# Altium PCB 24V-10A-Power-Board-v1.0.PcbDoc (part 4 of 5)
Units mil, origin at the board's own origin, x right, y up, seen from the top; angles counter-clockwise.
Board outline 6000 x 4000 mil, 2 copper layers (Top Layer, Bottom Layer); 609 components, 307 nets, 1491 pads, 0 vias.
Unrouted connection lines stored in the file: 1132.
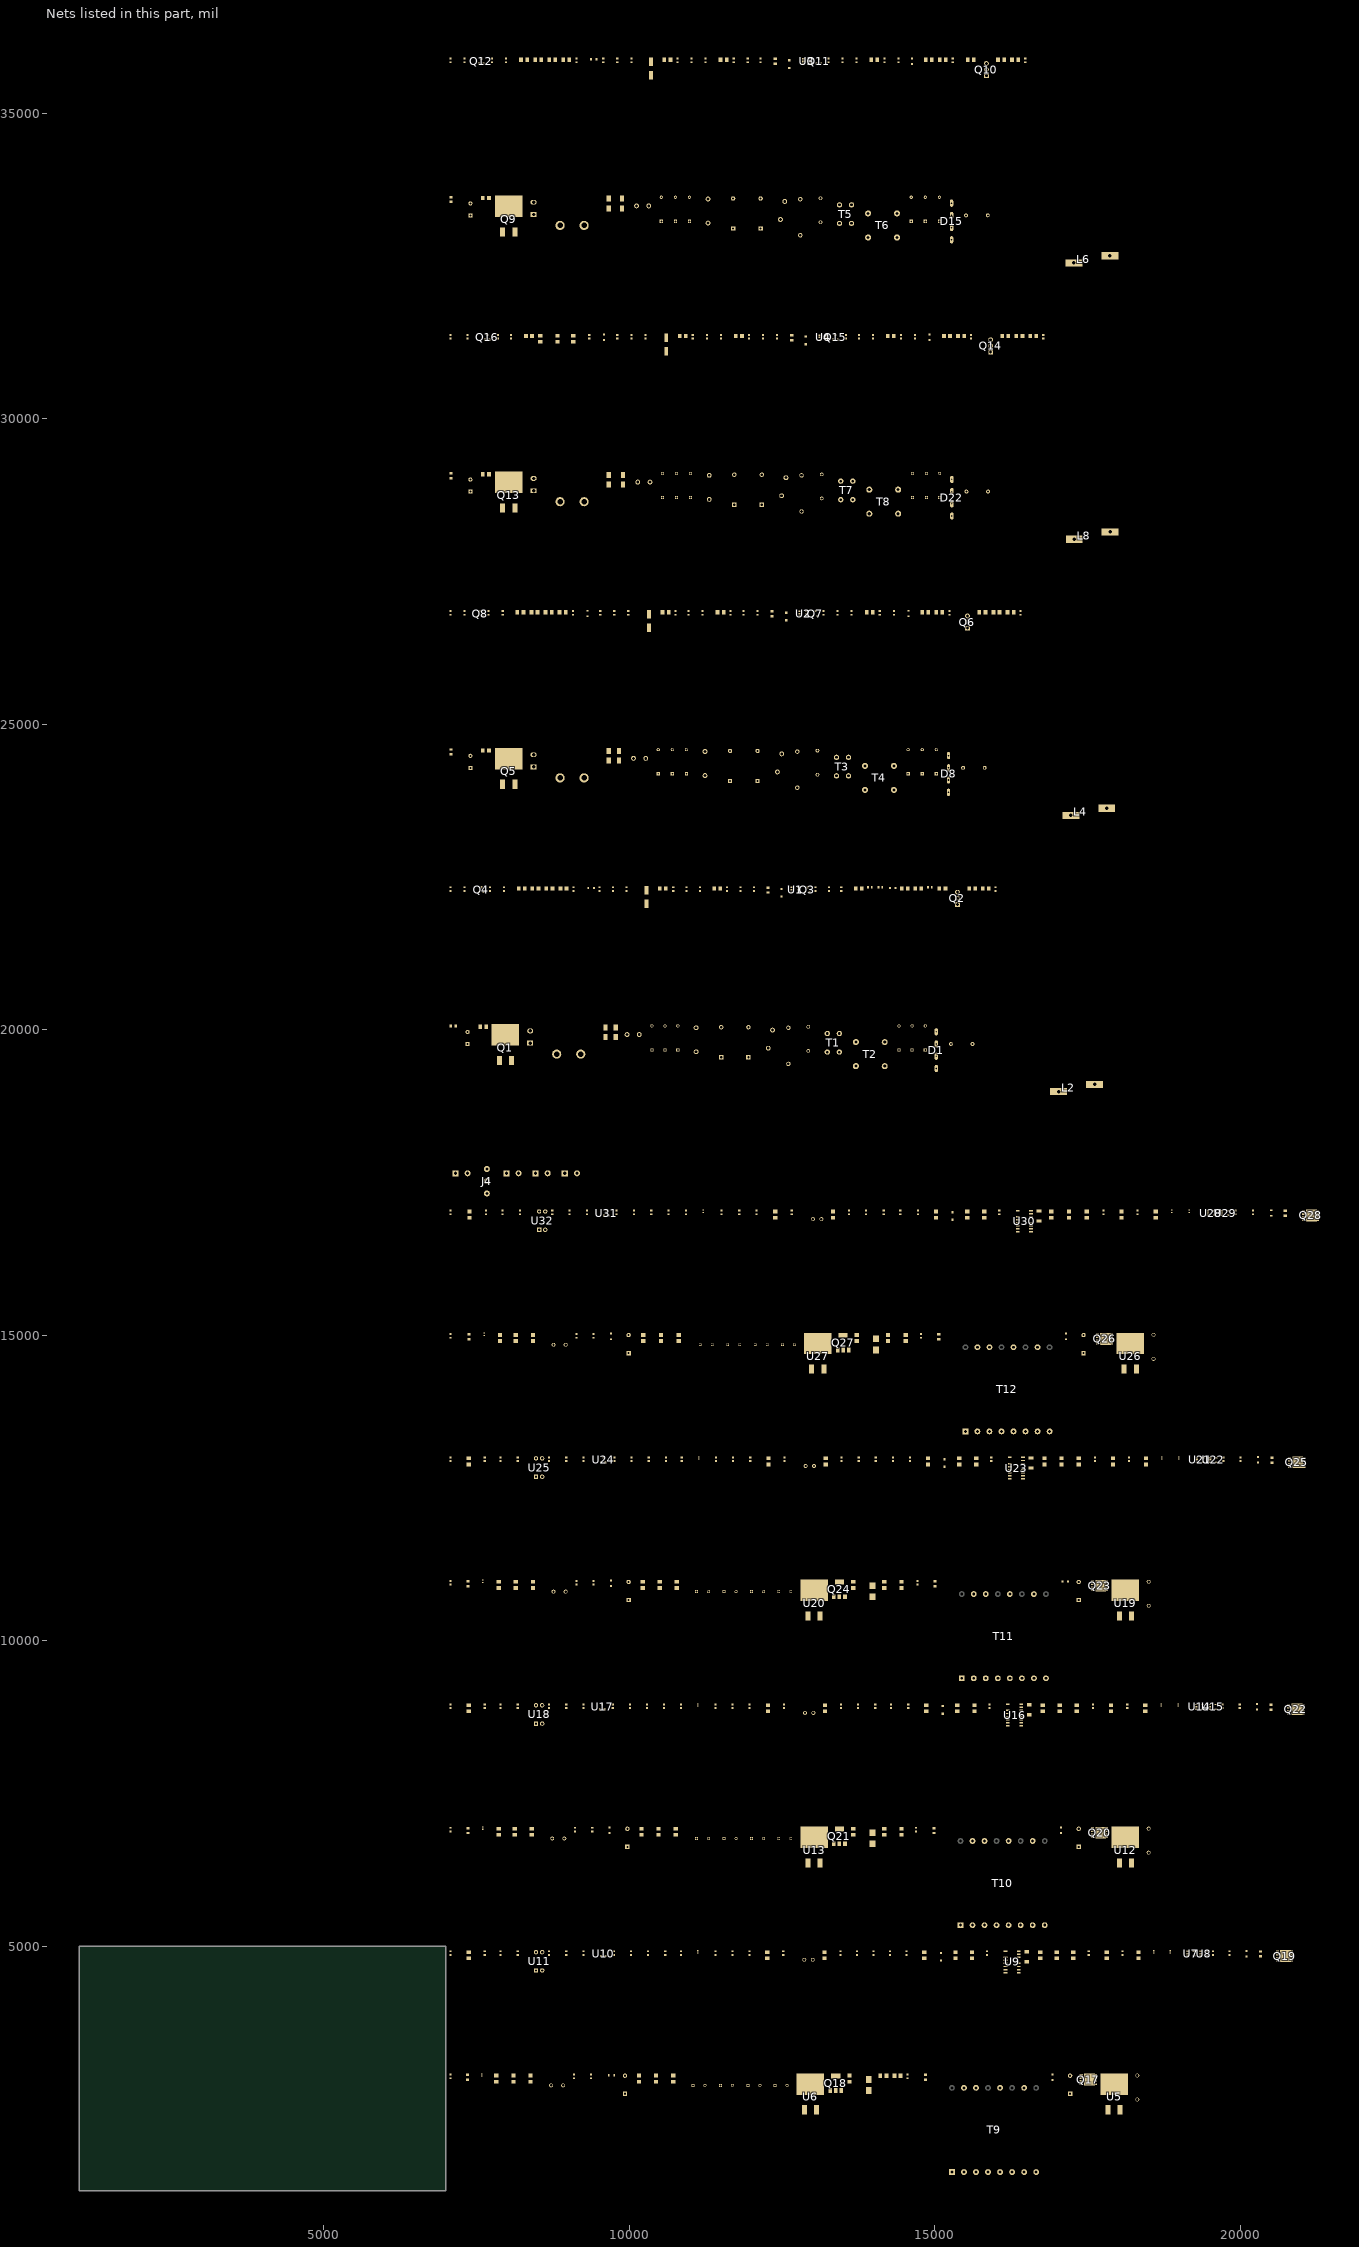
[diagram p2: the nets of this part, all layers, seen from the top]

## Part data (continued)
R106 R111 R136 R141 R166 R171 R196 R201: library part RC0805FR-7W10KL, "RES 10K OHM 1% 1/4W 0805", LCSC Part Number=C723404, Manufacturer=Yageo, Supplier Part Number=49AK3472, Category="Chip SMD Resistors", Item Type=Resistor, Manufacturer Part Number=RC0805FR-7W10KL, Pricing="1=0.153, 25=0.038, 50=0.03, 100=0.02 (USD)", RoHS=Yes, Stock=5000, Supplier=Avnet
R107 R137 R167 R197: library part CRCW12060000Z0EA, "RES SMD 0 OHM JUMPER 1/4W 1206", Case Code (Imperial)=1206, Case Code (Metric)=3216, LCSC Part Number=C190124, Manufacturer=Vishay, Max Operating Temperature=155°C, Max Power Dissipation=250mW, Min Operating Temperature=-55°C, Package Quantity=5000, Ratings=AEC-Q200, Resistor Type="Thick Film", Temperature Coefficient=100ppm/°C, Tolerance=1%, Voltage Rating=200V, Case/Package=1206, ComponentLink1Description=https://datasheet.ciiva.com/7841/1720486-7841862.pdf?src-supplier=Element14, ComponentLink1URL=https://datasheet.ciiva.com/7841/1720486-7841862.pdf?src-supplier=Element14, Construction=Rectangular, Contact Plating=Tin, Depth=1.6mm, Features="Automotive AEC-Q200", Height=0.55mm, Item Type=Resistor, Lead Free=5697LeadFree, Length=3.2mm, Manufacturer Part Number=CRCW12060000Z0EA, Military Standard=Not, Number of Terminations=2, Packaging="Tape and Reel", Power Rating=250mW, Pricing="1=0.1, 10=0.039, 50=0.039, 100=0.018, 1000=0.013, 10000=0.007 (USD)", Radiation Hardening=No, Reach SVHC Compliant=Unknown, RoHS=Yes, RoHS Compliant=Yes, Series=CRCW, Stock=852938, Supplier=Mouser, Technology="THICK FILM", Termination=SMD/SMT, Voltage Rating (DC)=200V, Weight=0.000353oz, Width=1.6mm
R108 R138 R168 R198: library part CRGH0603F26K1, "RES SMD 26.1K OHM 1% 1/5W 0603", Case Code (Imperial)=0603, Case Code (Metric)=1608, LCSC Part Number=C4086912, Manufacturer="TE Connectivity", Max Operating Temperature=155°C, Max Power Dissipation=200mW, Min Operating Temperature=-55°C, Number of Resistors=1, Resistor Type="Thick Film,Power resistor", Temperature Coefficient=100ppm/°C, Tolerance=1%, Voltage Rating=50V, Case/Package=0603, ComponentLink1Description=http://www.mouser.com/ds/2/418/NG_DS_1773204-1_C-717624.pdf?src-supplier=Mouser, ComponentLink1URL=http://www.mouser.com/ds/2/418/NG_DS_1773204-1_C-717624.pdf?src-supplier=Mouser, ComponentLink2Description=https://www.te.com/commerce/DocumentDelivery/DDEController?Action=srchrtrv&amp;DocNm=1773204-1&amp;DocType=DS&amp;DocLang=English&src-supplier=Digikey, ComponentLink2URL=https://www.te.com/commerce/DocumentDelivery/DDEController?Action=srchrtrv&amp;DocNm=1773204-1&amp;DocType=DS&amp;DocLang=English&src-supplier=Digikey, ELV=Compliant, Height=0.45mm, Item Type=Resistor, Length=1.6mm, Manufacturer Part Number=CRGH0603F26K1, Mounting Technology="Surface Mount", Number of Terminations=2, Packaging="Tape and Reel", Power Rating=200mW, Pricing="20000=0.00865 (USD)", RoHS=Yes, RoHS Compliant=Yes, Series="CRGH, Neohm", Supplier=Digikey, Termination=Solder, Width=0.8mm
R109 R139 R169 R199: library part CRCW06037K15FKEA, "RES SMD 7.15K OHM 1% 1/10W 0603", LCSC Part Number=C844382, Manufacturer=Vishay, ComponentLink1Description=https://datasheet.ciiva.com/11810/0900766b80d98afc-11810198.pdf?src-supplier=Rs, ComponentLink1URL=https://datasheet.ciiva.com/11810/0900766b80d98afc-11810198.pdf?src-supplier=Rs, ComponentLink2Description=https://datasheet.ciiva.com/22707/1697337-22707757.pdf?src-supplier=Element14, ComponentLink2URL=https://datasheet.ciiva.com/22707/1697337-22707757.pdf?src-supplier=Element14, ComponentLink3Description=https://datasheet.ciiva.com/7679/1697337-7679142.pdf?src-supplier=Element14, ComponentLink3URL=https://datasheet.ciiva.com/7679/1697337-7679142.pdf?src-supplier=Element14, ComponentLink4Description=https://datasheet.ciiva.com/7679/1697337-7679143.pdf?src-supplier=Element14, ComponentLink4URL=https://datasheet.ciiva.com/7679/1697337-7679143.pdf?src-supplier=Element14, ComponentLink5Description=https://datasheet.ciiva.com/16397/dcrcwe3-16397317.pdf?src-supplier=Future+Electronics, ComponentLink5URL=https://datasheet.ciiva.com/16397/dcrcwe3-16397317.pdf?src-supplier=Future+Electronics, ComponentLink6Description=https://datasheet.ciiva.com/2466/dcrcwe3-2466245.pdf?src-supplier=Digikey, ComponentLink6URL=https://datasheet.ciiva.com/2466/dcrcwe3-2466245.pdf?src-supplier=Digikey, ComponentLink7Description=https://datasheet.ciiva.com/2466/dcrcwe3-2466246.pdf?src-supplier=Digikey, ComponentLink7URL=https://datasheet.ciiva.com/2466/dcrcwe3-2466246.pdf?src-supplier=Digikey, ComponentLink8Description=https://datasheet.ciiva.com/2466/dcrcwe3-2466247.pdf?src-supplier=Digikey, ComponentLink8URL=https://datasheet.ciiva.com/2466/dcrcwe3-2466247.pdf?src-supplier=Digikey, ComponentLink9Description=https://datasheet.ciiva.com/3257/dcrcwe3-3257899.pdf?src-supplier=Avnet, ComponentLink9URL=https://datasheet.ciiva.com/3257/dcrcwe3-3257899.pdf?src-supplier=Avnet, Item Type=Resistor, Lead Free=5697LeadFree, Manufacturer Part Number=CRCW06037K15FKEA, Pricing="1=0.1, 10=0.019, 50=0.019, 100=0.009, 1000=0.007, 10000=0.004 (USD)", RoHS=Yes, Stock=18619, Supplier=Mouser
R112 R142 R172 R202: library part CRCW08055K60FKEA, "RES SMD 5.6K OHM 1% 1/8W 0805", Case Code (Imperial)=0805, Case Code (Metric)=2012, LCSC Part Number=C844634, Manufacturer=Vishay, Max Operating Temperature=155°C, Max Power Dissipation=125mW, Min Operating Temperature=-55°C, Package Quantity=5000, Ratings=AEC-Q200, Resistance Tolerance=1%, Resistor Type="Thick Film", Supplier Part Number=6791572P, Temperature Coefficient=100ppm/°C, Voltage Rating=150V, Case/Package=0805, Category="Chip SMD Resistors", ComponentLink1Description=https://datasheet.ciiva.com/11811/0900766b80d98b26-11811062.pdf?src-supplier=Rs, ComponentLink1URL=https://datasheet.ciiva.com/11811/0900766b80d98b26-11811062.pdf?src-supplier=Rs, ComponentLink2Description=https://datasheet.ciiva.com/2525/dcrcwe3-2525722.pdf?src-supplier=Digi-Key, ComponentLink2URL=https://datasheet.ciiva.com/2525/dcrcwe3-2525722.pdf?src-supplier=Digi-Key, ComponentLink3Description=https://datasheet.ciiva.com/16767/70201119-16767127.pdf?src-supplier=Allied+Electronics, ComponentLink3URL=https://datasheet.ciiva.com/16767/70201119-16767127.pdf?src-supplier=Allied+Electronics, ComponentLink4Description=https://datasheet.ciiva.com/7841/1697337-7841861.pdf?src-supplier=Element14, ComponentLink4URL=https://datasheet.ciiva.com/7841/1697337-7841861.pdf?src-supplier=Element14, ComponentLink5Description=https://datasheet.ciiva.com/26317/fld-crcw-e3-data-en-26317147.pdf?src-supplier=Distrelec, ComponentLink5URL=https://datasheet.ciiva.com/26317/fld-crcw-e3-data-en-26317147.pdf?src-supplier=Distrelec, ComponentLink6Description=https://datasheet.ciiva.com/7841/1697337-7841690.pdf?src-supplier=Element14, ComponentLink6URL=https://datasheet.ciiva.com/7841/1697337-7841690.pdf?src-supplier=Element14, ComponentLink7Description=https://datasheet.ciiva.com/22683/1847332-22683327.pdf?src-supplier=Element14, ComponentLink7URL=https://datasheet.ciiva.com/22683/1847332-22683327.pdf?src-supplier=Element14, ComponentLink8Description=https://datasheet.ciiva.com/2525/dcrcwe3-2525723.pdf?src-supplier=Digi-Key, ComponentLink8URL=https://datasheet.ciiva.com/2525/dcrcwe3-2525723.pdf?src-supplier=Digi-Key, ComponentLink9Description=https://datasheet.ciiva.com/2525/dcrcwe3-2525724.pdf?src-supplier=Digi-Key, ComponentLink9URL=https://datasheet.ciiva.com/2525/dcrcwe3-2525724.pdf?src-supplier=Digi-Key, ComponentLink10Description=https://datasheet.ciiva.com/9065/dcrcwe3-9065422.pdf?src-supplier=Avnet, ComponentLink10URL=https://datasheet.ciiva.com/9065/dcrcwe3-9065422.pdf?src-supplier=Avnet, Contact Plating=Tin, Depth=1.25mm, Features="Automotive AEC-Q200", Height=0.45mm, Item Type=Resistor, Length=2mm, Manufacturer Part Number=CRCW08055K60FKEA, Number of Terminations=2, Packaging="Tape and Reel", Pins=2, Power Rating=125mW, Pricing="1250=0.024, 2500=0.013, 4000=0.015, 5000=0.011 (GBP)", Reach SVHC Compliant=Unknown, RoHS=Yes, RoHS Compliant=Yes, Series=CRCW, Stock=100250, Supplier=Rs, Technology="THICK FILM", Termination=SMD/SMT, Tolerance=1%, Voltage Rating (DC)=150V, Weight=0.000194oz, Width=1.25mm
R113 R143 R173 R203: library part RK73G1JTTD1002F, "RES 10K OHM 1% 1/10W 0603", Case Code (Imperial)=0603, Case Code (Metric)=1608, LCSC Part Number=C362180, Max Operating Temperature=125°C, Min Operating Temperature=-55°C, Power Rating=100mW, Supplier Part Number=2019-RK73G1JTTD1002FCT-ND, Temperature Coefficient=50ppm/°C, Tolerance=1%, Voltage Rating=75V, Case/Package=0603, Category="Chip SMD Resistors", ComponentLink1Description=LCSC, ComponentLink2Description=http://www.mouser.com/ds/2/219/RK73G-9863.pdf?src-supplier=Mouser, ComponentLink2URL=http://www.mouser.com/ds/2/219/RK73G-9863.pdf?src-supplier=Mouser, Construction=Rectangular, Depth=0.8mm, Item Type=Resistor, Length=1.6mm, Military Standard=Not, Packaging="Tape and Reel", Pricing="1=0.22, 10=0.118, 50=0.0812, 100=0.0699, 500=0.0513, 1000=0.04545 (USD)", RoHS=Yes, RoHS Compliant=Yes, Series=RK73G, Stock=249394, Supplier=Digi-Key, Termination=SMD/SMT
R114 R144 R174 R204: library part CR0603-FX-4991ELF, "RES SMD 4.99K OHM 1% 1/10W 0603", LCSC Part Number=C203645, Manufacturer=Bourns, Voltage Rating (DC)=50V, ComponentLink1Description=https://datasheet.ciiva.com/9122/chpreztr-9122757.pdf?src-supplier=Avnet, ComponentLink1URL=https://datasheet.ciiva.com/9122/chpreztr-9122757.pdf?src-supplier=Avnet, ComponentLink2Description=https://datasheet.ciiva.com/6547/chpreztr-6547333.pdf?src-supplier=Digikey, ComponentLink2URL=https://datasheet.ciiva.com/6547/chpreztr-6547333.pdf?src-supplier=Digikey, ComponentLink3Description=https://datasheet.ciiva.com/6547/chpreztr-6547335.pdf?src-supplier=Digikey, ComponentLink3URL=https://datasheet.ciiva.com/6547/chpreztr-6547335.pdf?src-supplier=Digikey, Item Type=Resistor, Manufacturer Part Number=CR0603-FX-4991ELF, Pricing="1=0.1, 10=0.014, 25=0.0108, 50=0.008, 100=0.0057, 250=0.00456, 500=0.00364, 1000=0.00268 (USD)", RoHS=Yes, RoHS Compliant=5897YesNo, Stock=84955, Supplier=Digikey, Thickness=457um
R115 R116 R145 R146 R175 R176 R205 R206: library part RC0402FR-070RL, "RES 0 OHM JUMPER 1/16W 0402", Case Code (Imperial)=0402, Case Code (Metric)=1005, LCSC Part Number=C106231, Manufacturer=Yageo, Max Operating Temperature=155°C, Max Power Dissipation=63mW, Min Operating Temperature=-55°C, Power Rating=62.5mW, Resistor Type="Thick Film", Supplier Part Number 1=603-RC0402FR-070RL, Temperature Coefficient=200ppm/°C, Tolerance=1%, Voltage Rating=50V, Case/Package=0402, ComponentLink1Description=https://datasheet.ciiva.com/8896/pyu-rc0402-51-rohs-l-6-8896149.pdf?src-supplier=Avnet, ComponentLink1URL=https://datasheet.ciiva.com/8896/pyu-rc0402-51-rohs-l-6-8896149.pdf?src-supplier=Avnet, ComponentLink2Description=https://datasheet.ciiva.com/16790/pyu-rc0402-51-rohs-l-6-r-16790444.pdf?src-supplier=Future+Electronics, ComponentLink2URL=https://datasheet.ciiva.com/16790/pyu-rc0402-51-rohs-l-6-r-16790444.pdf?src-supplier=Future+Electronics, Contact Plating=Tin,Matte, Features="Moisture Resistant", Height=0.35mm, Item Type=Resistors, Lead Free="Lead Free", Length=1mm, Manufacturer Part Number=RC0402FR-070RL, Mount="Surface Mount", Number of Terminations=2, Packaging="Tape and Reel", Pricing 1="1=0.10000, 10=0.01400, 50=0.01400, 100=0.00600, 1000=0.00300, 5000=0.00200, 10000=0.00100 (USD)", Radiation Hardening=No, Resistance=0R, RoHS=Yes, RoHS Compliant=Yes, Series=RC, Size Code=0402, Stock 1=8556842, Supplier 1=Mouser, Termination=SMD/SMT, Width=0.5mm
R117 R118 R119 R147 R148 R149 R177 R178 R179 R207 R208 R209: library part RC1206FR-071K65L, "RES 1.65K OHM 1% 1/4W 1206", LCSC Part Number=C488588, Manufacturer=Yageo, ComponentLink1Description=https://datasheet.ciiva.com/15159/getdatasheetpartid-45723-15159541.pdf?src-supplier=Verical, ComponentLink1URL=https://datasheet.ciiva.com/15159/getdatasheetpartid-45723-15159541.pdf?src-supplier=Verical, ComponentLink2Description=https://datasheet.ciiva.com/17086/pyu-rc1206-51-rohs-l-4-17086185.pdf?src-supplier=Future+Electronics, ComponentLink2URL=https://datasheet.ciiva.com/17086/pyu-rc1206-51-rohs-l-4-17086185.pdf?src-supplier=Future+Electronics, Item Type=Resistor, Manufacturer Part Number=RC1206FR-071K65L, Pricing="1=0.1, 10=0.038, 50=0.0244, 100=0.0206, 500=0.01434, 1000=0.01248 (USD)", RoHS=Yes, Stock=18321, Supplier=Digikey
R120 R150 R180 R210: library part RC0603FR-072R2L, "RES 2.2 OHM 1% 1/10W 0603", Case Code (Imperial)=0603, Case Code (Metric)=1608, LCSC Part Number=C112307, Manufacturer=Yageo, Max Operating Temperature=155°C, Max Power Dissipation=100mW, Min Operating Temperature=-55°C, Package Quantity=1, Resistance Tolerance=1%, Resistor Type="Thick Film", Temperature Coefficient=200ppm/°C, Voltage Rating=50V, Case/Package=0603, ComponentLink1Description=https://datasheet.ciiva.com/11808/0900766b80f96399-11808160.pdf?src-supplier=Rs, ComponentLink1URL=https://datasheet.ciiva.com/11808/0900766b80f96399-11808160.pdf?src-supplier=Rs, ComponentLink2Description=https://datasheet.ciiva.com/2554/pyu-r-int-thick-7-2554421.pdf?src-supplier=Digikey, ComponentLink2URL=https://datasheet.ciiva.com/2554/pyu-r-int-thick-7-2554421.pdf?src-supplier=Digikey, ComponentLink3Description=https://datasheet.ciiva.com/2554/pyu-r-int-thick-7-2554422.pdf?src-supplier=Digikey, ComponentLink3URL=https://datasheet.ciiva.com/2554/pyu-r-int-thick-7-2554422.pdf?src-supplier=Digikey, ComponentLink4Description=https://datasheet.ciiva.com/2554/pyu-r-int-thick-7-2554420.pdf?src-supplier=Digikey, ComponentLink4URL=https://datasheet.ciiva.com/2554/pyu-r-int-thick-7-2554420.pdf?src-supplier=Digikey, Depth=0.8mm, Features="Moisture Resistant", Height=0.022inch, Item Type=Resistors, Lead Free="Lead Free", Length=0.063inch, Manufacturer Part Number=RC0603FR-072R2L, Number of Terminations=2, Packaging="Tape and Reel", Pins=2, Power Rating=100mW, Pricing="1=0.1, 10=0.029, 50=0.0188, 100=0.0158, 500=0.01094, 1000=0.00947 (USD)", Reach SVHC Compliant=No, RoHS=Yes, RoHS Compliant=Yes, Series=RC, Stock=331140, Supplier=Digikey, Technology="THICK FILM", Termination=SMD/SMT, Tolerance=1%, Voltage Rating (DC)=50V, Width=0.031inch
R121 R122 R124 R151 R152 R154 R181 R182 R184 R211 R212 R214: library part RC1206FR-074M99L, "RES 4.99M OHM 1% 1/4W 1206", Case Code (Imperial)=1206, Case Code (Metric)=3216, LCSC Part Number=C488845, Manufacturer=Yageo, Max Operating Temperature=155°C, Max Power Dissipation=250mW, Min Operating Temperature=-55°C, Package Quantity=1, Temperature Coefficient=100ppm/°C, Tolerance=1%, Voltage Rating=200V, Case/Package=1206, ComponentLink1Description=https://datasheet.ciiva.com/2521/pyu-rc1206-51-rohs-l-4-2521020.pdf?src-supplier=Digikey, ComponentLink1URL=https://datasheet.ciiva.com/2521/pyu-rc1206-51-rohs-l-4-2521020.pdf?src-supplier=Digikey, ComponentLink2Description=https://datasheet.ciiva.com/2521/pyu-rc1206-51-rohs-l-4-2521021.pdf?src-supplier=Digikey, ComponentLink2URL=https://datasheet.ciiva.com/2521/pyu-rc1206-51-rohs-l-4-2521021.pdf?src-supplier=Digikey, ComponentLink3Description=https://datasheet.ciiva.com/2521/pyu-rc1206-51-rohs-l-4-2521019.pdf?src-supplier=Digikey, ComponentLink3URL=https://datasheet.ciiva.com/2521/pyu-rc1206-51-rohs-l-4-2521019.pdf?src-supplier=Digikey, Contact Plating=Tin,Matte, Features="Moisture Resistant", Height=0.026inch, Item Type=Resistors, Lead Free="Lead Free", Length=0.122inch, Manufacturer Part Number=RC1206FR-074M99L, Number of Terminations=2, Packaging="Tape and Reel", Power Rating=250mW, Pricing="1=0.1, 10=0.038, 50=0.0244, 100=0.0206, 500=0.01434, 1000=0.01248 (USD)", RoHS=Yes, RoHS Compliant=Yes, Series=RC, Stock=11560, Supplier=Digikey, Termination=SMD/SMT, Voltage Rating (DC)=200V, Width=0.063inch
R123 R153 R183 R213: library part RC0603FR-07274KL, "RES 274K OHM 1% 1/10W 0603", LCSC Part Number=C482818, Manufacturer=Yageo, ComponentLink1Description=https://datasheet.ciiva.com/2454/pyu-r-int-thick-7-2454960.pdf?src-supplier=Digikey, ComponentLink1URL=https://datasheet.ciiva.com/2454/pyu-r-int-thick-7-2454960.pdf?src-supplier=Digikey, ComponentLink2Description=https://datasheet.ciiva.com/2454/pyu-r-int-thick-7-2454961.pdf?src-supplier=Digikey, ComponentLink2URL=https://datasheet.ciiva.com/2454/pyu-r-int-thick-7-2454961.pdf?src-supplier=Digikey, ComponentLink3Description=https://datasheet.ciiva.com/2454/pyu-r-int-thick-7-2454962.pdf?src-supplier=Digikey, ComponentLink3URL=https://datasheet.ciiva.com/2454/pyu-r-int-thick-7-2454962.pdf?src-supplier=Digikey, Item Type=Resistors, Manufacturer Part Number=RC0603FR-07274KL, Pricing="1=0.1, 10=0.019, 50=0.0114, 100=0.0094, 500=0.00632, 1000=0.0054 (USD)", RoHS=Yes, Stock=204071, Supplier=Digikey
R125 R155 R185 R215: library part CRCW0603100RFKEA, "RES SMD 100 OHM 1% 1/10W 0603", Case Code (Imperial)=0603, Case Code (Metric)=1608, LCSC Part Number=C844917, Manufacturer="Vishay Dale", Max Operating Temperature=155°C, Max Power Dissipation=100mW, Min Operating Temperature=-55°C, Package Quantity=10, Ratings=AEC-Q200, Resistance Tolerance=1%, Resistor Type="Thick Film", Temperature Coefficient=100ppm/°C, Voltage Rating=75V, Case/Package=0603, ComponentLink1Description=https://datasheet.ciiva.com/22666/1720486-22666207.pdf?src-supplier=Element14, ComponentLink1URL=https://datasheet.ciiva.com/22666/1720486-22666207.pdf?src-supplier=Element14, ComponentLink2Description=https://datasheet.ciiva.com/26316/fld-crcw-e3-data-en-26316566.pdf?src-supplier=Distrelec, ComponentLink2URL=https://datasheet.ciiva.com/26316/fld-crcw-e3-data-en-26316566.pdf?src-supplier=Distrelec, ComponentLink3Description=https://datasheet.ciiva.com/22673/1697337-22673066.pdf?src-supplier=Element14, ComponentLink3URL=https://datasheet.ciiva.com/22673/1697337-22673066.pdf?src-supplier=Element14, ComponentLink4Description=https://datasheet.ciiva.com/2465/dcrcwe3-2465544.pdf?src-supplier=Digikey, ComponentLink4URL=https://datasheet.ciiva.com/2465/dcrcwe3-2465544.pdf?src-supplier=Digikey, ComponentLink5Description=https://datasheet.ciiva.com/2465/dcrcwe3-2465545.pdf?src-supplier=Digikey, ComponentLink5URL=https://datasheet.ciiva.com/2465/dcrcwe3-2465545.pdf?src-supplier=Digikey, ComponentLink6Description=https://datasheet.ciiva.com/2465/dcrcwe3-2465543.pdf?src-supplier=Digikey, ComponentLink6URL=https://datasheet.ciiva.com/2465/dcrcwe3-2465543.pdf?src-supplier=Digikey, ComponentLink7Description=https://datasheet.ciiva.com/16721/70201119-16721486.pdf?src-supplier=Allied+Electronics, ComponentLink7URL=https://datasheet.ciiva.com/16721/70201119-16721486.pdf?src-supplier=Allied+Electronics, ComponentLink8Description=https://datasheet.ciiva.com/16787/70201119-16787964.pdf?src-supplier=Allied+Electronics, ComponentLink8URL=https://datasheet.ciiva.com/16787/70201119-16787964.pdf?src-supplier=Allied+Electronics, ComponentLink9Description=https://datasheet.ciiva.com/5550/dcrcwe3-109170-5550286.pdf?src-supplier=Mouser, ComponentLink9URL=https://datasheet.ciiva.com/5550/dcrcwe3-109170-5550286.pdf?src-supplier=Mouser, ComponentLink10Description=https://datasheet.ciiva.com/16199/dcrcwe3-16199102.pdf?src-supplier=Future+Electronics, ComponentLink10URL=https://datasheet.ciiva.com/16199/dcrcwe3-16199102.pdf?src-supplier=Future+Electronics, Construction=Rectangular, Depth=0.85mm, Features="Automotive AEC-Q200", Height=0.02inch, Item Type=Resistors, Lead Free=5697LeadFree, Length=1.55mm, Manufacturer Part Number=CRCW0603100RFKEA, Military Standard=Not, Number of Terminations=2, Packaging="Tape and Reel", Pins=2NUMBER, Power Rating=100mW, Pricing="1=0.1, 10=0.017, 50=0.017, 100=0.01, 1000=0.008, 10000=0.004 (USD)", Reach SVHC Compliant=Unknown, RoHS=Yes, RoHS Compliant=Yes, Series=CRCW, Stock=584918, Supplier=Mouser, Termination=SMD/SMT, Tolerance=1%, Voltage Rating (DC)=75V, Weight=7.1E-05oz, Width=0.033inch
R126 R156 R186 R216: library part RT0603BRE07301KL, "RES SMD 301K OHM 0.1% 1/10W 0603", Case/Package=0603, LCSC Part Number=C326750, Manufacturer=Yageo, Max Operating Temperature=125°C, Max Power Dissipation=100mW, Min Operating Temperature=-55°C, Package Quantity=5000, Resistance=301kR, Resistor Type="Thin Film", Supplier Part Number 1=603-RT0603BRE07301KL, Temperature Coefficient=50ppm/°C, Tolerance=0.1%, Voltage Rating (DC)=50V, Category="Chip SMD Resistors", ComponentLink1Description=https://datasheet.ciiva.com/2584/pyu-rt-1-to-0-05-rohs-l-5-2584420.pdf?src-supplier=Digi-Key, ComponentLink1URL=https://datasheet.ciiva.com/2584/pyu-rt-1-to-0-05-rohs-l-5-2584420.pdf?src-supplier=Digi-Key, Height=0.022inch, Item Type=Resistor, Lead Free="Lead Free", Length=0.063inch, Manufacturer Part Number=RT0603BRE07301KL, Number of Terminations=2, Packaging="Tape and Reel", Pricing 1="1=0.42000, 10=0.30200, 50=0.30200, 100=0.12100, 1000=0.06000, 10000=0.04900 (USD)", RoHS=Yes, RoHS Compliant=Yes, Series=RT, Stock 1=2800, Supplier 1=Mouser, Width=0.031inch
R127 R157 R187 R217: library part CRCW060337K4FKEA, "RES SMD 37.4K OHM 1% 1/10W 0603", LCSC Part Number=C844359, Manufacturer=Vishay, ComponentLink1Description=https://datasheet.ciiva.com/5541/dcrcwe3-109170-5541061.pdf?src-supplier=Mouser, ComponentLink1URL=https://datasheet.ciiva.com/5541/dcrcwe3-109170-5541061.pdf?src-supplier=Mouser, ComponentLink2Description=https://datasheet.ciiva.com/22705/1697337-22705851.pdf?src-supplier=Element14, ComponentLink2URL=https://datasheet.ciiva.com/22705/1697337-22705851.pdf?src-supplier=Element14, ComponentLink3Description=https://datasheet.ciiva.com/16770/70201119-16770680.pdf?src-supplier=Allied+Electronics, ComponentLink3URL=https://datasheet.ciiva.com/16770/70201119-16770680.pdf?src-supplier=Allied+Electronics, ComponentLink4Description=https://datasheet.ciiva.com/7671/1697337-7671645.pdf?src-supplier=Element14, ComponentLink4URL=https://datasheet.ciiva.com/7671/1697337-7671645.pdf?src-supplier=Element14, ComponentLink5Description=https://datasheet.ciiva.com/7671/1697337-7671646.pdf?src-supplier=Element14, ComponentLink5URL=https://datasheet.ciiva.com/7671/1697337-7671646.pdf?src-supplier=Element14, ComponentLink6Description=https://datasheet.ciiva.com/3257/dcrcwe3-3257503.pdf?src-supplier=Avnet, ComponentLink6URL=https://datasheet.ciiva.com/3257/dcrcwe3-3257503.pdf?src-supplier=Avnet, ComponentLink7Description=https://datasheet.ciiva.com/7792/125364-7792237.pdf?src-supplier=Element14, ComponentLink7URL=https://datasheet.ciiva.com/7792/125364-7792237.pdf?src-supplier=Element14, ComponentLink8Description=https://datasheet.ciiva.com/16203/dcrcwe3-16203015.pdf?src-supplier=Future+Electronics, ComponentLink8URL=https://datasheet.ciiva.com/16203/dcrcwe3-16203015.pdf?src-supplier=Future+Electronics, ComponentLink9Description=https://datasheet.ciiva.com/2465/dcrcwe3-2465762.pdf?src-supplier=Digikey, ComponentLink9URL=https://datasheet.ciiva.com/2465/dcrcwe3-2465762.pdf?src-supplier=Digikey, ComponentLink10Description=https://datasheet.ciiva.com/2465/dcrcwe3-2465763.pdf?src-supplier=Digikey, ComponentLink10URL=https://datasheet.ciiva.com/2465/dcrcwe3-2465763.pdf?src-supplier=Digikey, ComponentLink11Description=https://datasheet.ciiva.com/2465/dcrcwe3-2465764.pdf?src-supplier=Digikey, ComponentLink11URL=https://datasheet.ciiva.com/2465/dcrcwe3-2465764.pdf?src-supplier=Digikey, ComponentLink12Description=https://datasheet.ciiva.com/8337/dcrcwe3-8337085.pdf?src-supplier=Avnet, ComponentLink12URL=https://datasheet.ciiva.com/8337/dcrcwe3-8337085.pdf?src-supplier=Avnet, Item Type=Resistor, Manufacturer Part Number=CRCW060337K4FKEA, Pricing="1=0.1, 10=0.026, 50=0.0166, 100=0.014, 500=0.00954, 1000=0.00824 (USD)", RoHS=Yes, Stock=9664, Supplier=Digikey
R128 R158 R188 R218: library part CRCW060344K2FKEA, "RES SMD 44.2K OHM 1% 1/10W 0603", LCSC Part Number=C844365, Manufacturer=Vishay, Voltage Rating (DC)=75V, ComponentLink1Description=https://datasheet.ciiva.com/11812/0900766b80d98afc-11812612.pdf?src-supplier=Rs, ComponentLink1URL=https://datasheet.ciiva.com/11812/0900766b80d98afc-11812612.pdf?src-supplier=Rs, ComponentLink2Description=https://datasheet.ciiva.com/2466/dcrcwe3-2466281.pdf?src-supplier=Digikey, ComponentLink2URL=https://datasheet.ciiva.com/2466/dcrcwe3-2466281.pdf?src-supplier=Digikey, ComponentLink3Description=https://datasheet.ciiva.com/2466/dcrcwe3-2466282.pdf?src-supplier=Digikey, ComponentLink3URL=https://datasheet.ciiva.com/2466/dcrcwe3-2466282.pdf?src-supplier=Digikey, ComponentLink4Description=https://datasheet.ciiva.com/2466/dcrcwe3-2466283.pdf?src-supplier=Digikey, ComponentLink4URL=https://datasheet.ciiva.com/2466/dcrcwe3-2466283.pdf?src-supplier=Digikey, ComponentLink5Description=https://datasheet.ciiva.com/15159/getdatasheetpartid-52050-15159597.pdf?src-supplier=Verical, ComponentLink5URL=https://datasheet.ciiva.com/15159/getdatasheetpartid-52050-15159597.pdf?src-supplier=Verical, ComponentLink6Description=https://datasheet.ciiva.com/16507/dcrcwe3-16507773.pdf?src-supplier=Future+Electronics, ComponentLink6URL=https://datasheet.ciiva.com/16507/dcrcwe3-16507773.pdf?src-supplier=Future+Electronics, ComponentLink7Description=https://datasheet.ciiva.com/22705/1697337-22705852.pdf?src-supplier=Element14, ComponentLink7URL=https://datasheet.ciiva.com/22705/1697337-22705852.pdf?src-supplier=Element14, ComponentLink8Description=https://datasheet.ciiva.com/7671/1697337-7671657.pdf?src-supplier=Element14, ComponentLink8URL=https://datasheet.ciiva.com/7671/1697337-7671657.pdf?src-supplier=Element14, ComponentLink9Description=https://datasheet.ciiva.com/7671/1697337-7671658.pdf?src-supplier=Element14, ComponentLink9URL=https://datasheet.ciiva.com/7671/1697337-7671658.pdf?src-supplier=Element14, ComponentLink10Description=https://datasheet.ciiva.com/16772/70201119-16772373.pdf?src-supplier=Allied+Electronics, ComponentLink10URL=https://datasheet.ciiva.com/16772/70201119-16772373.pdf?src-supplier=Allied+Electronics, ComponentLink11Description=https://datasheet.ciiva.com/22872/70201119-22872024.pdf?src-supplier=Allied+Electronics, ComponentLink11URL=https://datasheet.ciiva.com/22872/70201119-22872024.pdf?src-supplier=Allied+Electronics, Item Type=Resistor, Lead Free=5697LeadFree, Manufacturer Part Number=CRCW060344K2FKEA, Pricing="1=0.1, 10=0.026, 50=0.0166, 100=0.014, 500=0.00954, 1000=0.00824 (USD)", RoHS=Yes, Stock=24979, Supplier=Digikey
R129 R159 R189 R219: library part RC0603JR-070RL, "RES 0 OHM JUMPER 1/10W 0603", Case Code (Imperial)=0603, Case Code (Metric)=1608, LCSC Part Number=C95177, Manufacturer=Yageo, Max Operating Temperature=155°C, Max Power Dissipation=100mW, Min Operating Temperature=-55°C, Package Quantity=5000, Resistance=0mR, Resistance Tolerance=5%, Resistor Type="Thick Film", Supplier Part Number 1=311-0.0GRCT-ND, Temperature Coefficient=200ppm/°C, Tolerance=1%, Voltage Rating=50V, Case/Package=0603, Category="Chip SMD Resistors", Construction=Rectangular, Contact Plating=Tin,Matte, Depth=0.8mm, Features="Moisture Resistant", Height=0.45mm, Item Type=Resistor, Lead Free="Lead Free", Length=1.6mm, Manufacturer Part Number=RC0603JR-070RL, Military Standard=Not, Number of Pins=2, Number of Terminations=2, Packaging="Tape and Reel", Power Rating=100mW, Pricing 1="1=0.10000, 10=0.01700, 25=0.01240, 50=0.00960, 100=0.00700, 250=0.00536, 500=0.00430, 1000=0.00316 (USD)", Radiation Hardening=No, Reach SVHC Compliant="No SVHC", RoHS=Yes, RoHS Compliant=Yes, Series=RC, Size Code=0603, Stock 1=18081776, Supplier 1=Digi-Key, Technology="THICK FILM", Termination=SMD/SMT, Voltage Rating (DC)=50V, Width=0.8mm
R130 R131 R160 R161 R190 R191 R220 R221: library part AC0603FR-07324KL, "RES SMD 324K OHM 1% 1/10W 0603", Case Code (Imperial)=0603, Case Code (Metric)=1608, LCSC Part Number=C227818, Manufacturer=Yageo, Max Operating Temperature=155°C, Max Power Dissipation=100mW, Min Operating Temperature=-55°C, Package Quantity=1, Temperature Coefficient=100ppm/°C, Tolerance=1%, Voltage Rating=50V, Case/Package=0603, ComponentLink1Description=http://www.mouser.com/ds/2/447/yageodocoutput-1111992.pdf?src-supplier=Mouser, ComponentLink1URL=http://www.mouser.com/ds/2/447/yageodocoutput-1111992.pdf?src-supplier=Mouser, ComponentLink2Description=https://www.yageo.com/upload/media/product/productsearch/datasheet/rchip/PYu-AC_51_RoHS_L_7.pdf?src-supplier=Digikey, ComponentLink2URL=https://www.yageo.com/upload/media/product/productsearch/datasheet/rchip/PYu-AC_51_RoHS_L_7.pdf?src-supplier=Digikey, Features="Moisture Resistant,Automotive AEC-Q200,Anti-Sulfur", Height=0.022inch, Item Type=Resistors, Length=0.063inch, Manufacturer Part Number=AC0603FR-07324KL, Number of Terminations=2, Packaging="Tape and Reel", Power Rating=100mW, Pricing="1=0.1, 10=0.021, 50=0.013, 100=0.0108, 500=0.00734, 1000=0.00633 (USD)", RoHS=Yes, RoHS Compliant=Yes, Series=AC, Stock=5000, Supplier=Digikey, Termination=SMD/SMT, Width=0.031inch
R132 R162 R192 R222: library part CRCW060320R0FKEA, "RES SMD 20 OHM 1% 1/10W 0603", Case Code (Imperial)=0603, Case Code (Metric)=1608, LCSC Part Number=C844755, Manufacturer=Vishay, Max Operating Temperature=155°C, Max Power Dissipation=100mW, Min Operating Temperature=-55°C, Package Quantity=10, Ratings=AEC-Q200, Resistance Tolerance=1%, Resistor Type="Thick Film", Temperature Coefficient=100ppm/°C, Voltage Rating=75V, Case/Package=0603, ComponentLink1Description=https://datasheet.ciiva.com/11810/0900766b80d98afc-11810778.pdf?src-supplier=Rs, ComponentLink1URL=https://datasheet.ciiva.com/11810/0900766b80d98afc-11810778.pdf?src-supplier=Rs, ComponentLink2Description=https://datasheet.ciiva.com/7748/1533075-7748858.pdf?src-supplier=Element14, ComponentLink2URL=https://datasheet.ciiva.com/7748/1533075-7748858.pdf?src-supplier=Element14, ComponentLink3Description=https://datasheet.ciiva.com/2465/dcrcwe3-2465673.pdf?src-supplier=Digikey, ComponentLink3URL=https://datasheet.ciiva.com/2465/dcrcwe3-2465673.pdf?src-supplier=Digikey, ComponentLink4Description=https://datasheet.ciiva.com/2465/dcrcwe3-2465674.pdf?src-supplier=Digikey, ComponentLink4URL=https://datasheet.ciiva.com/2465/dcrcwe3-2465674.pdf?src-supplier=Digikey, ComponentLink5Description=https://datasheet.ciiva.com/16776/70201119-16776202.pdf?src-supplier=Allied+Electronics, ComponentLink5URL=https://datasheet.ciiva.com/16776/70201119-16776202.pdf?src-supplier=Allied+Electronics, ComponentLink6Description=https://datasheet.ciiva.com/26316/fld-crcw-e3-data-en-26316589.pdf?src-supplier=Distrelec, ComponentLink6URL=https://datasheet.ciiva.com/26316/fld-crcw-e3-data-en-26316589.pdf?src-supplier=Distrelec, ComponentLink7Description=https://datasheet.ciiva.com/2465/dcrcwe3-2465672.pdf?src-supplier=Digikey, ComponentLink7URL=https://datasheet.ciiva.com/2465/dcrcwe3-2465672.pdf?src-supplier=Digikey, ComponentLink8Description=https://datasheet.ciiva.com/16788/70201119-16788011.pdf?src-supplier=Allied+Electronics, ComponentLink8URL=https://datasheet.ciiva.com/16788/70201119-16788011.pdf?src-supplier=Allied+Electronics, ComponentLink9Description=https://datasheet.ciiva.com/5548/dcrcwe3-109170-5548022.pdf?src-supplier=Mouser, ComponentLink9URL=https://datasheet.ciiva.com/5548/dcrcwe3-109170-5548022.pdf?src-supplier=Mouser, ComponentLink10Description=https://datasheet.ciiva.com/3257/dcrcwe3-3257244.pdf?src-supplier=Avnet, ComponentLink10URL=https://datasheet.ciiva.com/3257/dcrcwe3-3257244.pdf?src-supplier=Avnet, ComponentLink11Description=https://datasheet.ciiva.com/16374/dcrcwe3-16374634.pdf?src-supplier=Future+Electronics, ComponentLink11URL=https://datasheet.ciiva.com/16374/dcrcwe3-16374634.pdf?src-supplier=Future+Electronics, ComponentLink12Description=https://datasheet.ciiva.com/3257/dcrcwe3-3257243.pdf?src-supplier=Avnet, ComponentLink12URL=https://datasheet.ciiva.com/3257/dcrcwe3-3257243.pdf?src-supplier=Avnet, Construction=Rectangular, Contact Plating=Tin, Depth=0.85mm, Features="Automotive AEC-Q200", Height=0.45mm, Item Type=Resistors, Lead Free="Lead Free", Length=1.55mm, Manufacturer Part Number=CRCW060320R0FKEA, Military Standard=Not, Number of Terminations=2, Packaging="Tape and Reel", Power Rating=100mW, Pricing="1=0.1, 10=0.026, 50=0.0166, 100=0.014, 500=0.00954, 1000=0.00824 (USD)", Radiation Hardening=No, Reach SVHC Compliant=Unknown, RoHS=Yes, RoHS Compliant=Yes, Series=CRCW, Stock=100733, Supplier=Digikey, Technology="THICK FILM", Termination=SMD/SMT, Tolerance=1%, Voltage Rating (DC)=75V, Weight=7.1E-05oz, Width=0.033inch
R133 R163 R193 R223: library part RC1206FR-0720KL, "RES 20K OHM 1% 1/4W 1206", LCSC Part Number=C114940, Manufacturer=Yageo, Voltage Rating (DC)=200V, ComponentLink1Description=https://datasheet.ciiva.com/11809/0900766b80c6630a-11809460.pdf?src-supplier=Rs, ComponentLink1URL=https://datasheet.ciiva.com/11809/0900766b80c6630a-11809460.pdf?src-supplier=Rs, ComponentLink2Description=https://datasheet.ciiva.com/16746/pyu-rc1206-51-rohs-l-4-16746334.pdf?src-supplier=Future+Electronics, ComponentLink2URL=https://datasheet.ciiva.com/16746/pyu-rc1206-51-rohs-l-4-16746334.pdf?src-supplier=Future+Electronics, Item Type=Resistors, Lead Free=5697LeadFree, Manufacturer Part Number=RC1206FR-0720KL, Pricing="1=0.1, 10=0.038, 50=0.0244, 100=0.0206, 500=0.01434, 1000=0.01248 (USD)", RoHS=Yes, Stock=286094, Supplier=Digikey
R134 R164 R194 R224: library part CRCW060312K4FKEA, "RES SMD 12.4K OHM 1% 1/10W 0603", Case Code (Imperial)=0603, Case Code (Metric)=1608, Case/Package=345Case, LCSC Part Number=C844524, Manufacturer=Vishay, Max Operating Temperature=155°C, Min Operating Temperature=-55°C, Power Rating=100mW, Resistance Tolerance=1%, Resistor Type="Thick Film", Temperature Coefficient=100ppm/°C, Voltage Rating=75V, ComponentLink1Description=http://www.farnell.com/datasheets/2310790.pdf?src-supplier=Farnell, ComponentLink1URL=http://www.farnell.com/datasheets/2310790.pdf?src-supplier=Farnell, ComponentLink2Description=https://datasheet.octopart.com/CRCW060312K4FKEA-Vishay-datasheet-62317933.pdf?src-supplier=Element14, ComponentLink2URL=https://datasheet.octopart.com/CRCW060312K4FKEA-Vishay-datasheet-62317933.pdf?src-supplier=Element14, ComponentLink3Description=http://www.farnell.com/datasheets/2310790.pdf?src-supplier=Newark, ComponentLink3URL=http://www.farnell.com/datasheets/2310790.pdf?src-supplier=Newark, ComponentLink4Description=https://datasheet.octopart.com/CRCW060312K4FKEA-Vishay-datasheet-5300368.pdf?src-supplier=Future+Electronics, ComponentLink4URL=https://datasheet.octopart.com/CRCW060312K4FKEA-Vishay-datasheet-5300368.pdf?src-supplier=Future+Electronics, ComponentLink5Description=http://www.farnell.com/datasheets/2310790.pdf?src-supplier=Element14, ComponentLink5URL=http://www.farnell.com/datasheets/2310790.pdf?src-supplier=Element14, ComponentLink6Description=https://datasheet.octopart.com/CRCW060312K4FKEA-Vishay-datasheet-83961561.pdf?src-supplier=Newark, ComponentLink6URL=https://datasheet.octopart.com/CRCW060312K4FKEA-Vishay-datasheet-83961561.pdf?src-supplier=Newark, Height=500um, Item Type=Resistors, Lead Free=5697LeadFree, Manufacturer Part Number=CRCW060312K4FKEA, Packaging=13Packaging, Pins=2NUMBER, Pricing="1=0.1, 10=0.026, 50=0.0166, 100=0.014, 500=0.00954, 1000=0.00824 (USD)", RoHS=Yes, RoHS Compliant=Yes, Stock=12301, Supplier=Digikey, Tolerance=1%
RT1 RT2 RT3 RT4: "ICL 10 OHM 20% 3.5A 11.5MM", Current Rating=3.5A, LCSC Part Number=C125458, Manufacturer="TDK EPCOS", Tolerance=20%, ComponentLink1Description=https://datasheet.ciiva.com/15097/getdatasheetpartid-119550-15097692.pdf?src-supplier=Verical, ComponentLink1URL=https://datasheet.ciiva.com/15097/getdatasheetpartid-119550-15097692.pdf?src-supplier=Verical, ComponentLink2Description=https://datasheet.ciiva.com/1321/1851770-1321676.pdf?src-supplier=Element14, ComponentLink2URL=https://datasheet.ciiva.com/1321/1851770-1321676.pdf?src-supplier=Element14, Diameter=11.5mm, Item Type=Thermistors, Lead Free=5697LeadFree, Manufacturer Part Number=B57236S0100M000, Pricing="1=0.84, 10=0.78, 50=0.646, 100=0.572, 1000=0.44, 10000=0.373 (USD)", RoHS=Yes, Stock=2235, Supplier=Mouser, Thickness=6mm
T1 T3 T5 T7: "CMC 1MH 3A 2LN TH", Manufacturer="Wurth Electronics", Supplier Part Number=732-1439-ND, ComponentLink1Description=https://datasheet.ciiva.com/4952/744822301-91864-4952415.pdf?src-supplier=Mouser, ComponentLink1URL=https://datasheet.ciiva.com/4952/744822301-91864-4952415.pdf?src-supplier=Mouser, ComponentLink2Description=https://datasheet.ciiva.com/11796/0900766b804ac271-11796688.pdf?src-supplier=Rs, ComponentLink2URL=https://datasheet.ciiva.com/11796/0900766b804ac271-11796688.pdf?src-supplier=Rs, ComponentLink3Description=https://datasheet.ciiva.com/7211/70388-7211253.pdf?src-supplier=Newark, ComponentLink3URL=https://datasheet.ciiva.com/7211/70388-7211253.pdf?src-supplier=Newark, ComponentLink4Description=https://datasheet.ciiva.com/7754/1736520-7754735.pdf?src-supplier=Element14, ComponentLink4URL=https://datasheet.ciiva.com/7754/1736520-7754735.pdf?src-supplier=Element14, ComponentLink5Description=https://datasheet.ciiva.com/6216/744822301-6216281.pdf?src-supplier=Digikey, ComponentLink5URL=https://datasheet.ciiva.com/6216/744822301-6216281.pdf?src-supplier=Digikey, Item Type=Inductor, Manufacturer Part Number=744822301, Pricing="1=4.57, 10=4.5, 50=3.57, 140=3.41, 280=3.1 (USD)", RoHS=Yes, Stock=1589, Supplier=Digikey
T2 T4 T6 T8: "CMC 10MH 3A 2LN TH", Case/Package=L, Current=3A, DC Resistance (DCR)=105mR, Inductance Tolerance=30%, Manufacturer="Wurth Electronics", Max Operating Temperature=125°C, Min Operating Temperature=-40°C, Package Quantity=200, Supplier Part Number=732-1452-ND, Test Frequency=10kHz, ComponentLink1Description=https://datasheet.ciiva.com/11796/0900766b804acf58-11796710.pdf?src-supplier=Rs, ComponentLink1URL=https://datasheet.ciiva.com/11796/0900766b804acf58-11796710.pdf?src-supplier=Rs, ComponentLink2Description=https://datasheet.ciiva.com/4952/744824310-39306-4952431.pdf?src-supplier=Mouser, ComponentLink2URL=https://datasheet.ciiva.com/4952/744824310-39306-4952431.pdf?src-supplier=Mouser, ComponentLink3Description=https://datasheet.ciiva.com/6214/744824310-6214810.pdf?src-supplier=Digikey, ComponentLink3URL=https://datasheet.ciiva.com/6214/744824310-6214810.pdf?src-supplier=Digikey, ComponentLink4Description=https://datasheet.ciiva.com/7211/70411-7211262.pdf?src-supplier=Newark, ComponentLink4URL=https://datasheet.ciiva.com/7211/70411-7211262.pdf?src-supplier=Newark, ComponentLink5Description=https://datasheet.ciiva.com/7754/1736534-7754741.pdf?src-supplier=Element14, ComponentLink5URL=https://datasheet.ciiva.com/7754/1736534-7754741.pdf?src-supplier=Element14, ComponentLink6Description=https://datasheet.ciiva.com/48690/001088035-da-01-ml-we-cmb-stromkomp-netzdrossel-74482-de-en-48690603.pdf?src-supplier=Conrad, ComponentLink6URL=https://datasheet.ciiva.com/48690/001088035-da-01-ml-we-cmb-stromkomp-netzdrossel-74482-de-en-48690603.pdf?src-supplier=Conrad, Current Rating=3A, Depth=18.5mm, Height=33mm, Item Type="Common Mode Chokes", Lead Free="Lead Free", Lead Pitch=10mm, Length=27.5mm, Manufacturer Part Number=744824310, Max DC Current=3A, Mounting Technology="Through Hole,Radial", Number of Lines=2, Packaging=Bulk, Pins=4, Pricing="1=5.63, 10=5.54, 100=4.39, 250=4.2, 500=3.82 (USD)", Reach SVHC Compliant=No, RoHS=Yes, RoHS Compliant=Yes, Series=WE-CMB, Stock=278, Supplier=Digikey, Termination=Radial, Tolerance=30%, Width=18.5mm
T9 T10 T11 T12: "XFMR RES CONV AC/DC 400UH TH", Current Rating=10.4A, Frequency=120kHz, Manufacturer="Wurth Electronics", Max Operating Temperature=125°C, Min Operating Temperature=-40°C, Output Voltage=24V, Package Quantity=20, Power Rating=250W, Supplier Part Number=732-5069-ND, ComponentLink1Description=https://datasheet.ciiva.com/24142/760895741-270531-24142074.pdf?src-supplier=Mouser, ComponentLink1URL=https://datasheet.ciiva.com/24142/760895741-270531-24142074.pdf?src-supplier=Mouser, ComponentLink2Description=https://datasheet.ciiva.com/29632/760895741-29632482.pdf?src-supplier=Digikey, ComponentLink2URL=https://datasheet.ciiva.com/29632/760895741-29632482.pdf?src-supplier=Digikey, Height=27.5mm, Item Type=Transformer, Length=48mm, Manufacturer Part Number=760895741, Mounting Technology="Through Hole", Output Current=10.4A, Packaging=Tray, Pricing="1=22.74, 10=21.792, 50=20.43, 100=18.3881, 500=15.66304 (USD)", RoHS=Yes, RoHS Compliant=Yes, Series=WE-LLCR, Shielding=Unshielded, Stock=7, Supplier=Digikey, Termination=Solder, Width=35mm
U1 U2 U3 U4: "IC PFC CTRLR TRANSITION SOT23-6", LCSC Part Number=C2868631, Manufacturer="Texas Instruments", Package=SOT-23-6, ComponentLink1Description=LCSC, ComponentLink1URL=https://www.lcsc.com/product-detail/AC-DC-Controllers-Regulators_Texas-Instruments-UCC28056DBVT_C2868631.html, Item Type=IC, Manufacturer Part Number=UCC28056DBVT
U5 U6 U12 U13 U19 U20 U26 U27: "MOSFET N-CH 650V 22.4A D2PAK", Case/Package=TO-263-3, LCSC Part Number=C536639, Manufacturer=Infineon, Halogen Free="Halogen Free", Item Type=Mosfet, Manufacturer Part Number=IPB65R150CFDA, Packaging="Tape and Reel", Pins=3, Pricing="1000=2.73 (USD)", Stock=1000, Supplier="Future Electronics"
U7 U8 U14 U15 U21 U22 U28 U29: "SYNC RECTIFIER FLYBACK", LCSC Part Number=C471044, Manufacturer="Texas Instruments", ComponentLink1Description=http://www.ti.com/general/docs/suppproductinfo.tsp?distId=10&amp;gotoUrl=http%3A%2F%2Fwww.ti.com%2Flit%2Fgpn%2Fucc24612&src-supplier=Digikey, ComponentLink1URL=http://www.ti.com/general/docs/suppproductinfo.tsp?distId=10&amp;gotoUrl=http%3A%2F%2Fwww.ti.com%2Flit%2Fgpn%2Fucc24612&src-supplier=Digikey, Height=1.45mm, Item Type=IC, Length=2.9mm, Manufacturer Part Number=UCC24612-2DBVR, Pins=5NUMBER, Pricing="1=0.92, 10=0.758, 50=0.758, 100=0.575, 1000=0.392, 10000=0.317 (USD)", RoHS=Yes, Stock=6284, Supplier=Mouser, Thickness=1.2mm, Width=1.6mm
U9 U16 U23 U30: "HALF BRIDGE CONT WITH HV DRIVER", LCSC Part Number=C2867939, Manufacturer="Texas Instruments", ComponentLink1Description=http://www.ti.com/general/docs/suppproductinfo.tsp?distId=10&amp;gotoUrl=http%3A%2F%2Fwww.ti.com%2Flit%2Fgpn%2Fucc256402&src-supplier=Digikey, ComponentLink1URL=http://www.ti.com/general/docs/suppproductinfo.tsp?distId=10&amp;gotoUrl=http%3A%2F%2Fwww.ti.com%2Flit%2Fgpn%2Fucc256402&src-supplier=Digikey, Item Type=IC, Manufacturer Part Number=UCC256404DDBR, Pricing="1=2.34, 10=1.99, 50=1.99, 100=1.69, 1000=1.15, 10000=0.981 (USD)", RoHS=Yes, Stock=2756, Supplier=Mouser
U10 U17 U24 U31: "IC VREF SHUNT ADJ 1% SOT23-3", LCSC Part Number=C1852128, Manufacturer="Texas Instruments", ComponentLink1Description=http://www.ti.com/general/docs/suppproductinfo.tsp?distId=10&amp;gotoUrl=http%3A%2F%2Fwww.ti.com%2Flit%2Fgpn%2Fatl431li-q1&src-supplier=Digikey, ComponentLink1URL=http://www.ti.com/general/docs/suppproductinfo.tsp?distId=10&amp;gotoUrl=http%3A%2F%2Fwww.ti.com%2Flit%2Fgpn%2Fatl431li-q1&src-supplier=Digikey, Item Type=IC, Manufacturer Part Number=ATL432LIAQDBZRQ1, Pricing="1=0.61, 10=0.523, 25=0.488, 100=0.3903, 250=0.3624, 500=0.30664, 1000=0.23695 (USD)", RoHS=Yes, Stock=1265, Supplier=Digikey
U11 U18 U25 U32: "Optocoupler DC-IN 1-CH Transistor DC-OUT 4-Pin PDIP", LCSC Part Number=C142630, Manufacturer="Vishay Semiconductors", ComponentLink1Description=https://datasheet.ciiva.com/26941/getdatasheetpartid-641306-26941970.pdf?src-supplier=Verical, ComponentLink1URL=https://datasheet.ciiva.com/26941/getdatasheetpartid-641306-26941970.pdf?src-supplier=Verical, ComponentLink2Description=https://datasheet.ciiva.com/2087/vo618a-2087569.pdf?src-supplier=Digikey, ComponentLink2URL=https://datasheet.ciiva.com/2087/vo618a-2087569.pdf?src-supplier=Digikey, ComponentLink3Description=https://datasheet.ciiva.com/8086/vo618a-8086102.pdf?src-supplier=Avnet, ComponentLink3URL=https://datasheet.ciiva.com/8086/vo618a-8086102.pdf?src-supplier=Avnet, Item Type=Optocouplers, Manufacturer Part Number=VO618A-3, Pricing="1=0.46, 10=0.283, 100=0.1626, 1000=0.12726, 2000=0.11666, 5000=0.10605, 10000=0.09898, 25000=0.09544 (USD)", RoHS=Yes, Stock=6419, Supplier=Digikey
VR1 VR2 VR3 VR4: "VARISTOR 430V 3.5KA DISC 10MM", Case/Package=Radial, Clamping Current=25A, Clamping Voltage=710V, Flammability Rating=5813Flammability, LCSC Part Number=C210564, Manufacturer="TDK EPCOS", Max Operating Temperature=85°C, Max Surge Current=3.5kA, Max Varistor Voltage=473V, Max Voltage Rating (AC)=275V, Max Voltage Rating (DC)=350V, Min Operating Temperature=-40°C, Min Varistor Voltage=387V, Power Rating=400mW, Tolerance=10%, Varistor Voltage=430V, ComponentLink1Description=http://www.farnell.com/datasheets/1680955.pdf?src-supplier=Farnell, ComponentLink1URL=http://www.farnell.com/datasheets/1680955.pdf?src-supplier=Farnell, ComponentLink2Description=http://www.farnell.com/datasheets/2311597.pdf?src-supplier=Farnell, ComponentLink2URL=http://www.farnell.com/datasheets/2311597.pdf?src-supplier=Farnell, ComponentLink3Description=http://components.arrow.com/part/dataview/30869957S9461734N9769?src-supplier=Arrow+Electronics, ComponentLink3URL=http://components.arrow.com/part/dataview/30869957S9461734N9769?src-supplier=Arrow+Electronics, ComponentLink4Description=http://www.farnell.com/datasheets/1680955.pdf?src-supplier=Element14, ComponentLink4URL=http://www.farnell.com/datasheets/1680955.pdf?src-supplier=Element14, ComponentLink5Description=http://www.farnell.com/datasheets/2311597.pdf?src-supplier=Newark, ComponentLink5URL=http://www.farnell.com/datasheets/2311597.pdf?src-supplier=Newark, ComponentLink6Description=http://datasheet.octopart.com/B72210S2271K101-EPCOS-datasheet-11546246.pdf?src-supplier=Distrelec, ComponentLink6URL=http://datasheet.octopart.com/B72210S2271K101-EPCOS-datasheet-11546246.pdf?src-supplier=Distrelec, ComponentLink7Description=https://en.tdk.eu/inf/70/db/var/SIOV_Leaded_AdvanceD.pdf?src-supplier=Digikey, ComponentLink7URL=https://en.tdk.eu/inf/70/db/var/SIOV_Leaded_AdvanceD.pdf?src-supplier=Digikey, ComponentLink8Description=https://datasheet.octopart.com/S10K275E2-EPCOS-datasheet-5104.pdf?src-supplier=Future+Electronics, ComponentLink8URL=https://datasheet.octopart.com/S10K275E2-EPCOS-datasheet-5104.pdf?src-supplier=Future+Electronics, ComponentLink9Description=http://datasheet.octopart.com/B72210S2271K101-EPCOS-datasheet-11546246.pdf?src-supplier=Mouser, ComponentLink9URL=http://datasheet.octopart.com/B72210S2271K101-EPCOS-datasheet-11546246.pdf?src-supplier=Mouser, ComponentLink10Description=https://datasheet.octopart.com/B72210S2271K101-EPCOS-datasheet-11546246.pdf?src-supplier=Newark, ComponentLink10URL=https://datasheet.octopart.com/B72210S2271K101-EPCOS-datasheet-11546246.pdf?src-supplier=Newark, ComponentLink11Description=http://datasheet.octopart.com/B72210S2271K101-EPCOS-datasheet-11546246.pdf?src-supplier=Avnet, ComponentLink11URL=http://datasheet.octopart.com/B72210S2271K101-EPCOS-datasheet-11546246.pdf?src-supplier=Avnet, ComponentLink12Description=http://www.epcos.com/inf/70/db/var_08/SIOV_Leaded_StandarD.pdf?src-supplier=Future+Electronics, ComponentLink12URL=http://www.epcos.com/inf/70/db/var_08/SIOV_Leaded_StandarD.pdf?src-supplier=Future+Electronics, ComponentLink13Description=http://datasheet.octopart.com/B72210S2271K101-EPCOS-datasheet-11546246.pdf?src-supplier=Verical, ComponentLink13URL=http://datasheet.octopart.com/B72210S2271K101-EPCOS-datasheet-11546246.pdf?src-supplier=Verical, ComponentLink14Description=http://datasheet.octopart.com/B72210S2271K101-EPCOS-datasheet-11546246.pdf?src-supplier=TME, ComponentLink14URL=http://datasheet.octopart.com/B72210S2271K101-EPCOS-datasheet-11546246.pdf?src-supplier=TME, ComponentLink15Description=http://datasheet.octopart.com/B72210S2271K101-EPCOS-datasheet-11546246.pdf?src-supplier=TTI, ComponentLink15URL=http://datasheet.octopart.com/B72210S2271K101-EPCOS-datasheet-11546246.pdf?src-supplier=TTI, ComponentLink16Description=http://datasheet.octopart.com/B72210S2271K101-EPCOS-datasheet-11546246.pdf?src-supplier=Rutronik, ComponentLink16URL=http://datasheet.octopart.com/B72210S2271K101-EPCOS-datasheet-11546246.pdf?src-supplier=Rutronik, Contact Plating=154ConductorMaterial, Current Rating=25A, Depth=5.4mm, Diameter=12mm, Energy=55J, ESD Protection=5898YesNo, Height=14.5mm, Item Type=Varistors, Lead Pitch=7.5mm, Lead/Base Style=Radial, Manufacturer Part Number=B72210S2271K101, Material=4240ConductorMaterial, Mounting Technology="Through Hole", Number of Circuits=1, Packaging=Bulk, Pricing="1=0.12365, 10=0.12192, 30=0.12018, 50=0.11845, 100=0.11671 (USD)", Radiation Hardening=5898YesNo, Reach SVHC Compliant=Unknown, RoHS=Yes, RoHS Compliant=Yes, Series=AdvanceD, Stock=5700, Supplier=Avnet, Termination=4745ConnectorType, Voltage Rating=350V, Voltage Rating (AC)=275V, Voltage Rating (DC)=350V, Voltage Tolerance=10%, Weight=2.000002g

## Nets (pads, with @x,y where several pads share a name; then routed paths per layer and width w, separated by ;. In a path a pad name is that pad's centre, name@x,y a point inside that pad or via, vN(x,y) a via of type N, cw(c..) or ccw(c..) an arc to the next point about the centre after c; other vN are vias at no path point)
24VDC-C1: C93.2 C95.1 C96.1 C97.1 C98.1 C99.1 C100.1 C101.2 C107.2 C108.2 C110.2 C112.2 J1.1 R132.2 T9.3 T9.4 T9.5 T9.6 U7.4 U8.4